# Altium PCB Phaser.PcbDoc (part 12 of 16)
Units mm, origin at the board's own origin, x right, y up, seen from the top; angles counter-clockwise.
Board outline 161.99 x 100 mm, 6 copper layers (TopLayer, MidLayer1, MidLayer2, SignalLayer1, Internal Plane 1, BottomLayer), stack 1.528 mm thick; 1017 components, 665 nets, 3453 pads, 2223 vias.
Unrouted connection lines stored in the file: 1.
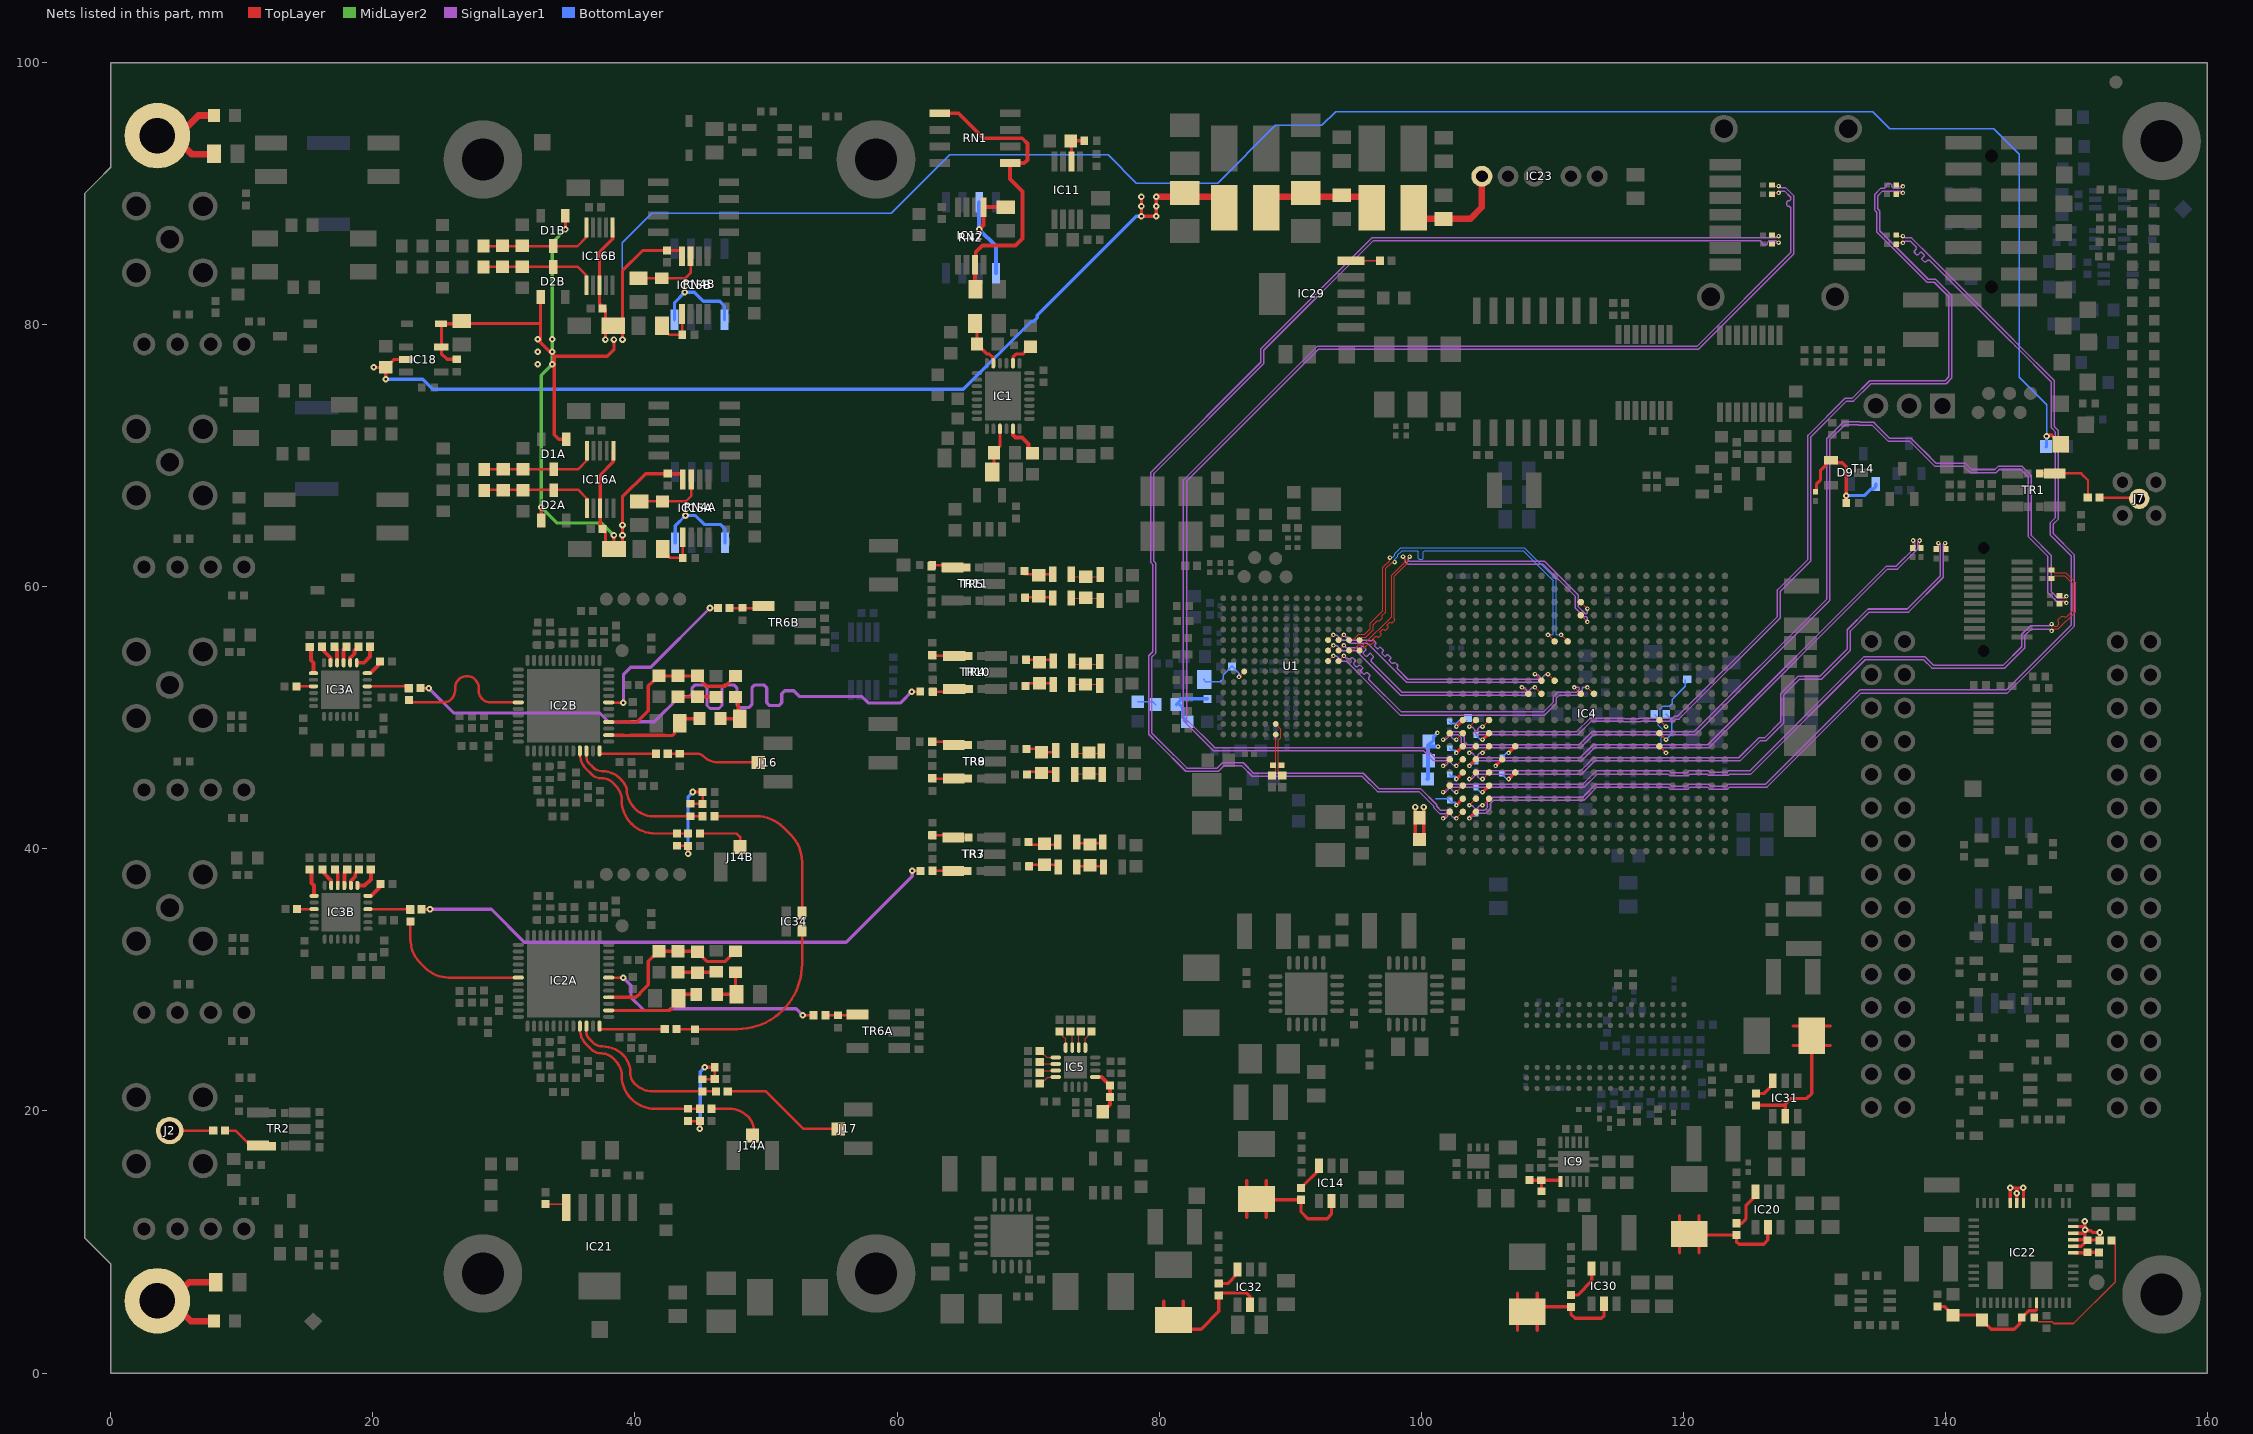
[diagram p14: the nets of this part, all layers, seen from the top]

## Via types
v1: diameter 0.5, hole 0.2, TopLayer to BottomLayer, tented both sides, 1374 vias
v2: diameter 0.35, hole 0.15, TopLayer to BottomLayer, tented both sides, 728 vias
v3: diameter 0.5, hole 0.2, TopLayer to BottomLayer, tented top, 96 vias
v4: diameter 0.6, hole 0.3, TopLayer to BottomLayer, 18 vias
v5: diameter 0.5, hole 0.2, TopLayer to BottomLayer, 5 vias
v6: diameter 0.35, hole 0.15, TopLayer to BottomLayer, 1 vias
v7: diameter 0.8, hole 0.5, TopLayer to BottomLayer, tented both sides, 1 vias

## Nets (pads, with @x,y where several pads share a name; then routed paths per layer and width w, separated by ;. In a path a pad name is that pad's centre, name@x,y a point inside that pad or via, vN(x,y) a via of type N, cw(c..) or ccw(c..) an arc to the next point about the centre after c; other vN are vias at no path point) (continued)
LVDSB11_N: IC4.J17 U1.K1 | length 27.4
  TopLayer w0.095: U1.K1@95.293,55.925 95.511,56.144 95.772,56.144 96.333,56.704 96.333,57.108 96.434,57.208 96.635,57.41 96.77,57.41 96.772,57.408 96.852,57.408 97.04,57.596 97.04,57.677 97.038,57.679 97.038,57.813 97.286,58.061 97.289,58.064 97.289,61.393 97.735,61.839 97.933,61.839 v2(97.964,61.87) ; v2(109.675,56.325) IC4.J17@110.175,55.825
  BottomLayer w0.095: v2(97.964,61.87) 97.994,61.9 97.994,62.098 98.205,62.309 98.205,62.421 98.539,62.755 99.251,62.755 99.393,62.755 99.678,62.755 99.773,62.66 99.773,62.177 99.849,62.101 100.077,62.101 100.153,62.177 100.153,62.66 100.248,62.755 100.589,62.755 107.772,62.755 110.065,60.462 110.065,56.381 110.009,56.325 v2(109.675,56.325)
LVDSB11_P: IC4.K17 U1.K2 | length 27.4
  TopLayer w0.095: U1.K2@94.489,55.925 94.557,55.993 94.846,55.993 95.216,56.364 95.681,56.364 96.113,56.796 96.113,57.199 97.069,58.155 97.069,61.484 97.58,61.995 97.58,62.193 v2(97.61,62.223) ; v2(110.675,56.325) IC4.K17@111.175,55.825
  BottomLayer w0.095: v2(97.61,62.223) 97.641,62.254 97.839,62.254 97.985,62.4 97.985,62.512 98.448,62.975 100.589,62.975 107.863,62.975 110.285,60.553 110.285,57.521 110.285,56.381 110.341,56.325 v2(110.675,56.325)
LVDSB12_N: IC4.H14 U1.K3 | length 19.5
  TopLayer w0.095: U1.K3@93.693,55.925 v2(94.093,56.325) ; v2(108.675,53.325) IC4.H14@109.175,52.825
  SignalLayer1 w0.115: v2@94.095,56.325 94.278,56.142 94.446,56.142 94.646,55.943 ; 94.667,55.922 95.995,55.922 96.035,55.881 96.198,55.881 96.251,55.934 96.336,55.934 96.534,55.736 96.534,55.651 96.442,55.559 96.442,55.475 96.64,55.277 96.725,55.277 96.817,55.368 96.902,55.368 97.1,55.17 97.1,55.086 97.008,54.994 97.008,54.909 97.206,54.711 97.291,54.711 97.382,54.803 97.467,54.803 97.665,54.605 97.665,54.52 97.573,54.428 97.573,54.343 97.771,54.145 97.856,54.145 97.923,54.211 98.007,54.211 98.205,54.013 98.205,53.929 98.178,53.901 98.178,53.739 98.254,53.662 98.974,52.943 108.973,52.943 109.041,53.01 109.041,53.145 108.898,53.287 108.713,53.287 v2(108.675,53.325)
LVDSB12_P: IC4.J14 U1.K4 | length 19.5
  TopLayer w0.095: U1.K4@92.893,55.925 v2(93.293,56.325) ; v2(109.675,53.325) IC4.J14@110.175,52.825
  SignalLayer1 w0.115: v2(93.293,56.325) 93.338,56.28 93.597,56.28 93.969,55.907 94.349,55.907 94.57,55.687 95.897,55.687 98.877,52.708 109.071,52.708 109.276,52.913 109.276,53.111 109.452,53.287 109.637,53.287 v2(109.675,53.325)
LVDSB13_N: IC4.L20 U1.J1 | length 27.1
  TopLayer w0.095: U1.J1@95.293,55.125 95.297,55.125 95.515,55.344 95.669,55.344 95.77,55.444 95.971,55.646 96.105,55.646 96.139,55.612 96.22,55.612 96.408,55.8 96.408,55.881 96.347,55.941 96.347,56.022 96.535,56.21 96.616,56.21 96.677,56.149 96.757,56.149 96.946,56.337 96.946,56.418 96.885,56.479 96.885,56.559 97.073,56.748 97.153,56.748 97.214,56.687 97.295,56.687 97.483,56.875 97.483,56.955 97.422,57.016 97.422,57.097 97.61,57.285 97.691,57.285 97.722,57.254 97.802,57.254 97.991,57.442 97.991,57.523 97.95,57.563 97.95,57.697 97.95,57.925 97.95,60.788 98.982,61.819 98.982,62.128 99.108,62.254 v2(99.108,62.297) ; IC4.L20@112.175,58.825 v2(112.675,58.325)
  SignalLayer1 w0.115: v2(99.108,62.297) 99.108,62.234 99.016,62.141 99.016,62.01 99.083,61.943 109.397,61.943 111.995,59.345 111.995,58.459 112.512,57.942 112.608,57.942 112.675,58.01 v2(112.675,58.325)
LVDSB13_P: IC4.L19 U1.J2 | length 27
  TopLayer w0.095: U1.J2@94.489,55.125 94.557,55.193 94.846,55.193 95.216,55.564 95.578,55.564 97.73,57.716 97.73,60.879 98.762,61.91 98.762,62.075 98.608,62.228 v2(98.608,62.297) ; IC4.L19@112.175,57.825 v2(112.675,57.325)
  SignalLayer1 w0.115: v2(98.608,62.297) 98.608,62.257 98.781,62.084 98.781,61.913 98.986,61.708 109.3,61.708 111.76,59.247 111.76,58.362 112.415,57.707 112.608,57.707 112.675,57.64 v2(112.675,57.325)
LVDSB14_N: IC4.G13 U1.J3 | length 18.6
  TopLayer w0.095: U1.J3@93.693,55.125 v2(94.093,55.525) ; v2(107.675,52.325) IC4.G13@108.175,51.825
  SignalLayer1 w0.115: v2(94.093,55.525) 94.095,55.525 94.278,55.342 95.13,55.342 95.17,55.302 95.333,55.302 95.498,55.467 95.555,55.467 95.781,55.241 95.781,55.184 95.563,54.966 95.563,54.909 95.789,54.683 95.846,54.683 96.071,54.909 96.128,54.909 96.354,54.682 96.354,54.626 96.181,54.453 96.181,54.291 96.31,54.162 98.53,51.942 107.973,51.943 108.041,52.01 108.041,52.145 107.898,52.287 v2@107.713,52.287
LVDSB14_P: IC4.H13 U1.J4 | length 18.6
  TopLayer w0.095: U1.J4@92.893,55.125 v2(93.293,55.525) ; v2(108.675,52.325) IC4.H13@109.175,51.825
  SignalLayer1 w0.115: v2(93.293,55.525) 93.338,55.48 93.597,55.48 93.969,55.107 95.032,55.107 98.432,51.707 102.931,51.707 108.071,51.708 108.276,51.913 108.276,52.111 108.452,52.287 108.637,52.287 v2(108.675,52.325)
LVDSB15_N: IC4.L13 U1.H3 | length 23.8
  TopLayer w0.095: U1.H3@93.693,54.325 v2(94.093,54.725) ; v2(111.675,52.325) IC4.L13@112.175,51.825
  SignalLayer1 w0.115: v2(94.093,54.725) 94.095,54.725 94.278,54.542 94.384,54.542 94.424,54.502 94.587,54.502 94.675,54.59 94.76,54.59 94.958,54.392 94.958,54.307 94.831,54.18 94.831,54.095 95.029,53.897 95.114,53.897 95.241,54.025 95.326,54.025 95.524,53.827 95.524,53.742 95.397,53.614 95.397,53.53 95.595,53.332 95.679,53.332 95.797,53.449 95.882,53.449 96.08,53.251 96.08,53.166 96.001,53.088 96.001,52.925 96.076,52.851 98.484,50.443 109.333,50.443 110.057,51.167 110.057,51.581 110.419,51.943 111.838,51.943 112.057,52.162 112.057,52.258 111.99,52.325 v2(111.675,52.325)
LVDSB15_P: IC4.M13 U1.H4 | length 23.8
  TopLayer w0.095: U1.H4@92.893,54.325 v2(93.293,54.725) ; v2(112.675,52.325) IC4.M13@113.175,51.825
  SignalLayer1 w0.115: v2(93.293,54.725) 93.338,54.68 93.597,54.68 93.969,54.307 94.286,54.307 95.909,52.684 98.386,50.208 109.431,50.208 110.292,51.069 110.292,51.483 110.517,51.708 111.935,51.708 112.292,52.065 112.292,52.258 112.36,52.325 v2(112.675,52.325)
M0: IC4.U11 R89.2 | length 5.6
  TopLayer w0.125: IC4.U11@118.175,49.825 v2(118.675,49.325)
  BottomLayer w0.075: 118.425,50.875 118.225,50.675 118.225,50.084 118.232,50.077 118.232,49.768 v2(118.675,49.325)
  BottomLayer w0.125: 118.425,50.875 118.95,50.875 119.15,51.075 119.15,51.4 120.15,52.4 R89.2@120.15,52.905
M1: IC4.U10 R91.2 | length 3
  TopLayer w0.125: IC4.U10@118.175,48.825 v2(118.675,48.325)
  BottomLayer w0.125: v2(118.675,48.325) 119.125,48.775 119.125,49.83 R91.2@118.68,50.275
M2: IC4.U9 R48.2 | length 4.1
  TopLayer w0.125: IC4.U9@118.175,47.825 v2(118.675,47.325)
  BottomLayer w0.075: R48.2@117.77,50.275 118.068,49.977 118.068,49.416 118.376,49.108 118.376,48.573 118.3,48.496 118.3,47.7 v2(118.675,47.325)
MGT_RX0_N: C204.2 IC4.A8 | length 100.9
  TopLayer w0.095: v2(101.675,46.325) IC4.A8@102.175,46.825 ; C204.2@126.77,89.953 126.877,90.06 v2(127.275,90.06)
  SignalLayer1 w0.115: v2@101.713,46.363 101.898,46.363 102.041,46.505 102.041,46.64 101.973,46.707 100.958,46.707 100.175,47.49 84.147,47.49 81.858,49.779 81.858,68.147 92.05,78.34 121.036,78.34 128.199,85.503 128.199,88.862 128.199,88.92 128.084,89.035 127.958,89.035 127.898,89.095 127.898,89.375 127.958,89.435 128.084,89.435 128.199,89.55 128.199,89.721 127.728,90.192 127.46,90.192 127.327,90.06 v2(127.275,90.06)
MGT_RX0_P: C203.2 IC4.B8 | length 101
  TopLayer w0.095: v2(102.675,46.325) IC4.B8@103.175,46.825 ; C203.2@126.77,90.653 126.863,90.56 v2(127.275,90.56)
  SignalLayer1 w0.115: v2(102.675,46.325) 102.637,46.363 102.452,46.363 102.276,46.539 102.276,46.737 102.071,46.942 101.055,46.942 100.273,47.725 84.244,47.725 82.093,49.876 82.093,68.05 92.148,78.105 121.133,78.105 128.434,85.406 128.434,89.818 127.825,90.427 127.46,90.427 127.327,90.56 v2(127.275,90.56)
MGT_RX1_N: C193.2 IC4.C11 | length 75.1
  TopLayer w0.095: v2(103.675,49.325) IC4.C11@104.175,49.825 ; C193.2@136.245,89.948 136.352,90.055 v2(136.75,90.055)
  SignalLayer1 w0.115: v2(103.675,49.325) 103.713,49.287 103.898,49.287 104.074,49.111 104.074,48.913 104.279,48.707 111.952,48.707 112.964,49.719 115.408,49.719 115.419,49.708 116.746,49.708 116.773,49.735 119.274,49.735 119.437,49.899 119.673,49.899 127.412,57.638 127.412,59.658 129.738,61.984 129.738,71.442 132.457,74.162 132.993,74.162 134.32,75.488 140.055,75.488 140.484,75.917 140.484,82.218 139.237,83.464 138.682,83.464 134.993,87.154 134.993,88.672 134.828,88.836 134.828,89.819 135.196,90.187 136.565,90.187 136.698,90.055 v2(136.75,90.055)
MGT_RX1_P: C192.2 IC4.D11 | length 75.1
  TopLayer w0.095: v2(104.675,49.325) IC4.D11@105.175,49.825 ; C192.2@136.245,90.648 136.338,90.555 v2(136.75,90.555)
  SignalLayer1 w0.115: v2(104.675,49.325) 104.637,49.287 104.452,49.287 104.309,49.145 104.309,49.01 104.377,48.942 111.855,48.942 112.866,49.954 115.505,49.954 115.517,49.943 116.648,49.943 116.676,49.97 119.176,49.97 119.34,50.134 119.575,50.134 127.177,57.735 127.177,59.755 129.503,62.081 129.503,71.539 132.36,74.397 132.896,74.397 134.222,75.723 139.957,75.723 140.249,76.015 140.249,82.121 139.14,83.229 138.585,83.229 134.758,87.057 134.758,88.575 134.593,88.739 134.593,89.917 135.092,90.415 135.099,90.422 135.382,90.422 135.497,90.537 135.497,90.669 135.557,90.729 135.837,90.729 135.897,90.669 135.897,90.537 136.012,90.422 136.297,90.422 136.47,90.422 136.565,90.422 136.698,90.555 v2(136.75,90.555)
MGT_RX2_N: C186.2 IC4.A10 | length 77.5
  TopLayer w0.095: v2(101.675,48.325) IC4.A10@102.175,48.825 ; C186.2@148.689,59.335 148.714,59.335 148.921,59.128 149.056,59.128 149.196,59.268 v2(149.225,59.268)
  SignalLayer1 w0.1: 148.375,59.323 148.375,59.312 148.56,59.128 149.041,59.128 149.181,59.268 v2(149.225,59.268)
  SignalLayer1 w0.115: v2(101.675,48.325) 101.713,48.363 101.898,48.363 102.074,48.539 102.074,48.737 102.279,48.942 102.934,48.942 103.003,48.874 103.102,48.774 103.292,48.584 103.292,48.167 103.515,47.944 ; 103.515,47.942 103.795,47.942 112.046,47.942 113.046,48.942 113.833,48.942 115.634,48.943 115.654,48.942 116.419,48.942 120.839,48.943 130.927,59.03 130.927,71.292 132.233,72.598 133.467,72.598 133.522,72.543 134.521,72.543 134.745,72.319 134.828,72.236 135.746,71.318 137.389,71.318 138.293,70.414 138.376,70.331 139.294,69.412 141.52,69.412 141.988,68.944 143.779,68.944 144.014,69.179 145.859,69.179 146.292,68.746 146.564,68.474 146.564,63.9 148.058,62.407 148.058,59.64 148.197,59.501 148.375,59.323
MGT_RX2_P: C185.2 IC4.B10 | length 77
  TopLayer w0.095: v2(102.675,48.325) IC4.B10@103.175,48.825 ; C185.2@148.689,58.7 148.714,58.7 148.921,58.908 149.056,58.908 149.196,58.768 v2(149.225,58.768)
  SignalLayer1 w0.1: 148.273,59.092 148.284,59.092 148.468,58.908 149.041,58.908 149.181,58.768 v2(149.225,58.768)
  SignalLayer1 w0.115: v2@102.637,48.363 102.452,48.363 102.309,48.505 102.309,48.64 102.377,48.707 102.836,48.707 103.057,48.486 103.057,48.069 103.126,48 103.28,47.846 ; 103.28,47.845 103.418,47.707 103.515,47.707 112.143,47.707 113.143,48.707 113.931,48.707 115.537,48.708 115.557,48.707 116.517,48.707 120.936,48.708 131.162,58.933 131.162,71.195 132.33,72.363 133.369,72.363 133.425,72.308 134.424,72.308 134.51,72.221 134.579,72.153 135.649,71.082 137.292,71.082 139.197,69.177 139.322,69.177 139.494,69.177 141.423,69.177 141.891,68.709 143.877,68.709 144.112,68.944 145.762,68.944 146.126,68.58 146.126,68.548 146.329,68.345 146.329,63.803 147.823,62.309 147.823,59.543 148.031,59.334 148.197,59.168 148.273,59.092
MGT_RX3_N: C199.2 IC4.C9 | length 43.3
  TopLayer w0.095: v2(103.675,47.325) IC4.C9@104.175,47.825 ; v2(138.036,63.525) 138.036,63.051 C199.2@138.133,62.953
  SignalLayer1 w0.115: v2(103.675,47.325) 103.713,47.287 103.898,47.287 104.074,47.111 104.074,46.913 104.279,46.707 112.215,46.707 113.215,47.707 121.954,47.707 135.587,61.341 136.343,61.341 137.903,62.901 137.903,63.398 138.03,63.525 v2(138.036,63.525)
MGT_RX3_P: C198.2 IC4.D9 | length 42.5
  TopLayer w0.095: v2(104.675,47.325) IC4.D9@105.175,47.825 ; C198.2@137.498,62.953 137.536,62.991 v2(137.536,63.525)
  SignalLayer1 w0.115: v2(104.675,47.325) 104.637,47.287 104.452,47.287 104.309,47.145 104.309,47.01 104.377,46.942 112.117,46.942 113.117,47.943 121.857,47.943 135.49,61.576 136.246,61.576 137.668,62.998 137.668,63.398 137.541,63.525 v2(137.536,63.525)
MGT_TX0_N: C205.2 IC4.A4 | length 103.8
  TopLayer w0.095: v2(101.675,42.325) IC4.A4@102.175,42.825 ; C205.2@126.77,86.843 126.863,86.75 v2(127.275,86.75)
  SignalLayer1 w0.115: v2(101.675,42.325) 101.713,42.363 101.898,42.363 102.041,42.505 102.041,42.64 101.973,42.707 101.955,42.689 101.395,42.689 100.94,43.144 100.94,43.259 99.836,44.363 96.654,44.363 95.478,45.539 87.107,45.539 86.321,46.325 84.931,46.325 84.528,45.922 82.026,45.922 79.947,48 79.205,48.743 79.205,54.729 79.516,55.04 79.516,61.699 79.369,61.846 79.369,68.739 87.754,77.125 87.754,78.145 96.226,86.617 127.09,86.617 127.223,86.75 v2(127.275,86.75)
MGT_TX0_P: C206.2 IC4.B4 | length 103.8
  TopLayer w0.095: v2(102.675,42.325) IC4.B4@103.175,42.825 ; C206.2@126.77,86.143 126.877,86.25 v2(127.275,86.25)
  SignalLayer1 w0.115: v2(102.675,42.325) 102.637,42.363 102.452,42.363 102.276,42.539 102.276,42.737 102.071,42.942 101.876,42.942 101.858,42.924 101.492,42.924 101.175,43.242 101.175,43.356 99.933,44.598 96.752,44.598 95.576,45.774 87.205,45.774 86.419,46.56 84.834,46.56 84.431,46.157 82.123,46.157 80.28,48 79.44,48.84 79.44,54.631 79.751,54.942 79.751,61.796 79.604,61.943 79.604,68.642 87.989,77.027 87.989,78.048 96.323,86.382 125.444,86.382 125.616,86.382 125.901,86.382 126.016,86.267 126.016,86.155 126.076,86.095 126.356,86.095 126.416,86.155 126.416,86.267 126.531,86.382 126.849,86.382 127.09,86.382 127.223,86.25 v2(127.275,86.25)
MGT_TX1_N: C197.2 IC4.C5 | length 90.1
  TopLayer w0.095: v2(103.675,43.325) IC4.C5@104.175,43.825 ; C197.2@136.245,86.838 136.338,86.745 v2(136.75,86.745)
  SignalLayer1 w0.115: v2(103.675,43.325) 103.713,43.287 103.898,43.287 104.074,43.111 104.074,42.913 104.279,42.707 104.934,42.707 105.284,43.058 105.284,43.476 105.515,43.707 105.675,43.707 112.42,43.707 113.42,44.707 118.833,44.707 119.007,44.534 120.343,44.534 120.517,44.707 121.833,44.707 122.008,44.532 123.342,44.532 123.517,44.707 126.383,44.707 133.565,51.889 144.728,51.889 149.843,57.003 149.843,62.43 148.261,64.012 148.221,64.051 148.221,64.775 148.622,65.176 148.622,71.912 148.553,71.981 148.299,72.235 148.299,75.729 145.504,78.524 144.945,79.083 138.956,85.072 138.873,85.155 137.416,86.612 136.935,86.612 136.802,86.745 v2(136.75,86.745)
MGT_TX1_P: C202.2 IC4.D5 | length 90
  TopLayer w0.095: v2(104.675,43.325) IC4.D5@105.175,43.825 ; C202.2@136.245,86.138 136.352,86.245 v2(136.75,86.245)
  SignalLayer1 w0.115: v2@104.637,43.287 104.452,43.287 104.309,43.145 104.309,43.01 104.377,42.942 104.836,42.942 105.049,43.155 105.049,43.574 105.418,43.942 112.322,43.942 113.322,44.942 118.931,44.942 119.104,44.769 120.246,44.769 120.419,44.942 121.931,44.942 122.106,44.767 123.244,44.767 123.419,44.942 126.286,44.942 133.468,52.124 144.631,52.124 149.608,57.101 149.608,62.333 148.261,63.679 148.094,63.846 147.986,63.954 147.986,64.872 148.387,65.273 148.387,71.815 148.064,72.138 148.064,75.632 145.338,78.358 144.848,78.848 139.159,84.537 139.118,84.577 138.987,84.709 138.858,84.837 138.786,84.91 138.623,84.91 138.492,84.779 138.407,84.779 138.209,84.977 138.209,85.061 138.379,85.232 138.379,85.317 138.181,85.515 138.096,85.515 137.898,85.317 137.813,85.317 137.615,85.515 137.615,85.599 137.774,85.759 137.774,85.921 137.573,86.123 137.451,86.245 137.318,86.377 136.935,86.377 136.802,86.245 v2(136.75,86.245)
MGT_TX2_N: C187.2 IC4.A6 | length 60.3
  TopLayer w0.095: v2(101.675,44.325) IC4.A6@102.175,44.825 ; C187.2@148.104,60.631 148.129,60.631 148.337,60.838 149.093,60.838 149.708,60.223 149.708,58.172 149.696,58.161 149.242,57.707 149.074,57.707 149.028,57.752 148.86,57.752 148.607,57.5 148.607,57.331 148.653,57.286 148.653,57.118 148.533,56.998 148.362,56.998 148.291,56.998 148.151,57.138 v2(148.107,57.138)
  SignalLayer1 w0.115: v2(101.675,44.325) 101.713,44.363 101.898,44.363 102.074,44.539 102.074,44.737 102.279,44.942 112.343,44.942 113.343,45.942 118.931,45.942 119.053,45.82 120.297,45.82 120.419,45.942 121.94,45.942 122.037,45.845 123.322,45.845 123.419,45.942 125.061,45.942 133.783,54.665 138.426,54.665 139.065,54.026 144.424,54.026 145.821,55.423 145.821,56.365 146.462,57.005 147.923,57.005 148.055,57.138 v2(148.107,57.138)
MGT_TX2_P: C188.2 IC4.B6 | length 60.3
  TopLayer w0.095: v2(102.675,44.325) IC4.B6@103.175,44.825 ; C188.2@148.104,61.266 148.129,61.266 148.337,61.058 149.184,61.058 149.928,60.315 149.928,58.081 148.624,56.778 148.291,56.778 148.151,56.638 v2(148.107,56.638)
  SignalLayer1 w0.115: v2(102.675,44.325) 102.637,44.363 102.452,44.363 102.309,44.505 102.309,44.64 102.377,44.707 112.44,44.707 113.44,45.707 118.833,45.707 118.956,45.585 120.394,45.585 120.517,45.707 121.842,45.707 121.939,45.61 123.42,45.61 123.517,45.707 125.158,45.707 133.881,54.43 138.329,54.43 138.968,53.791 144.522,53.791 146.056,55.325 146.056,56.267 146.559,56.77 147.923,56.77 148.055,56.638 v2(148.107,56.638)
MGT_TX3_N: C200.2 IC4.C7 | length 48.4
  TopLayer w0.095: v2(103.675,45.325) IC4.C7@104.175,45.825 ; C200.2@139.299,62.868 139.452,63.02 v2(139.452,63.323)
  SignalLayer1 w0.115: v2@103.713,45.363 103.898,45.363 104.074,45.539 104.074,45.737 104.279,45.942 112.142,45.942 113.142,46.942 124.231,46.942 125.752,48.463 126.187,48.463 127.432,49.708 127.432,51.844 128.757,53.169 130.435,53.169 132.512,55.245 132.512,56.72 134.091,58.299 137.084,58.299 139.598,60.814 139.598,63.255 139.584,63.255 139.515,63.323 v2(139.452,63.323)
MGT_TX3_P: C201.2 IC4.D7 | length 48.4
  TopLayer w0.095: v2(104.675,45.325) IC4.D7@105.175,45.825 ; v2(139.982,63.323) 139.982,62.935 C201.2@140.049,62.868
  SignalLayer1 w0.115: v2(104.675,45.325) 104.637,45.363 104.452,45.363 104.309,45.505 104.309,45.64 104.377,45.707 112.24,45.707 113.24,46.707 124.329,46.707 125.849,48.228 126.285,48.228 127.667,49.61 127.667,51.746 128.854,52.934 130.533,52.934 132.747,55.148 132.747,56.623 134.188,58.064 137.181,58.064 139.833,60.717 139.833,63.255 139.85,63.255 139.918,63.323 v2(139.982,63.323)
MGTAVCC: C57.2 C100.2 C124.2 C125.2 C148.2 C220.2 IC4.D6 IC4.D10 IC4.E8 IC4.F7 IC4.F9 L15.2 | length 10.7
  TopLayer w0.25: v2(104.675,44.325) IC4.D6@105.175,44.825 ; v2(104.675,48.325) IC4.D10@105.175,48.825 ; v2(105.675,46.325) IC4.E8@106.175,46.825 ; v2(106.675,45.325) IC4.F7@107.175,45.825 ; v2(106.675,47.325) IC4.F9@107.175,47.825
  BottomLayer w0.125: C57.2@100.53,47.878 C57.2@100.589,47.937 ; C220.2@104.175,44.675 104.525,44.325 v2(104.675,44.325) ; C125.2@104.175,48.675 104.525,48.325 v2(104.675,48.325) ; C100.2@106.175,45.675 106.525,45.325 v2(106.675,45.325) ; C124.2@106.175,46.975 106.525,47.325 v2(106.675,47.325)
  BottomLayer w0.25: C57.2@100.589,47.937 100.939,48.287 100.939,48.545 101.234,48.84 v2(101.234,48.85)
  BottomLayer w0.3: L15.2@100.489,45.325 100.53,45.366 100.53,46.712 C57.2@100.53,47.878 ; C57.2@100.589,47.937 100.725,47.802 v2(101.282,47.802)
MGTAVTT: C97.2 C101.2 C112.2 C113.2 C114.2 C115.2 C116.2 IC4.B5 IC4.B7 IC4.B9 IC4.B11 IC4.C4 IC4.C8 L18.2 R191.1 | length 17.5
  TopLayer w0.25: v1(99.55,43.188) 99.55,41.031 L18.2@99.867,40.713 100.185,41.031 v1(100.185,43.188) ; v2(102.675,43.325) IC4.B5@103.175,43.825 ; v2(102.675,45.325) IC4.B7@103.175,45.825 ; v2(102.675,47.325) IC4.B9@103.175,47.825 ; v2(102.675,49.325) IC4.B11@103.175,49.825 ; v2(103.675,42.325) IC4.C4@104.175,42.825 ; v2(103.675,46.325) IC4.C8@104.175,46.825
  BottomLayer w0.125: 101.111,43.825 102.038,43.825 C115.2@102.175,43.688 ; C112.2@102.15,49.725 102.15,49.705 102.288,49.567 102.584,49.567 102.675,49.476 v2(102.675,49.325) ; C115.2@102.175,43.675 C115.2@102.175,43.688 ; C114.2@102.175,45.675 102.175,45.655 102.313,45.517 102.609,45.517 102.7,45.426 v2@102.7,45.275 ; C97.2@102.175,47.675 102.175,47.655 102.313,47.517 102.609,47.517 102.7,47.426 v2@102.7,47.275 ; v2@102.562,45.216 102.562,45.512 ; v2@102.562,47.216 102.562,47.512 ; v2@102.689,49.476 102.689,49.573 102.884,49.768 R191.1@103.471,49.768 ; v2@102.7,43.287 102.7,43.439 102.609,43.53 102.313,43.53 102.175,43.667 C115.2@102.175,43.688 ; v2@103.65,42.275 103.65,42.426 103.741,42.517 104.038,42.517 104.175,42.655 C116.2@104.175,42.675 ; v2@103.65,46.275 103.65,46.426 103.741,46.517 104.038,46.517 104.175,46.655 C113.2@104.175,46.675 ; v2@103.788,42.216 103.788,42.512 ; v2@103.788,46.216 103.788,46.512
N11V5A: C230A.2 C230B.2 C231A.2 C231B.2 C241A.2 C241B.2 C366.2 D1A.1 D1B.1 D2A.1 D2B.1 D3.2 IC15A.4 IC15B.4 IC16A.3 IC16A.6 IC16B.3 IC16B.6 IC18.5 R53.2 R220.2 TP11.1 | length 245.2
  TopLayer w0.25: R53.2@26.409,77.353 25.664,77.353 25.234,77.783 IC18.5@25.234,78.283 25.234,80.033 D3.2@25.209,80.058 26.559,80.058 C366.2@26.784,80.283 26.984,80.083 29.509,80.083 32.759,80.083 ; v1@32.65,78.775 32.8,78.625 ; D2B.1@32.8,82.105 32.8,78.625 ; D2A.1@32.85,65.055 v1(32.85,66.075) ; v1(34.7,87.26) D1B.1@34.7,88.28 ; D1A.1@34.75,71.255 34.175,71.255 33.85,71.58 33.85,77.575 ; C230B.2@37.375,81.48 C230B.2@37.7,81.155 ; C230A.2@37.425,64.455 37.75,64.13 37.75,62.88 C231A.2@38.4,62.88 v1(38.4,63.925) ; C230B.2@37.475,81.43 37.3,81.605 IC16B.3@37.3,83.005 37.3,85.55 38.3,86.55 IC16B.6@38.3,87.405 ; C230A.2@37.525,64.405 37.35,64.58 IC16A.3@37.35,65.98 37.35,68.525 38.35,69.525 IC16A.6@38.35,70.38 ; v1(37.75,78.86) C230B.2@37.75,81.205 ; v1(38.4,78.86) 38.4,78.075 37.9,77.575 33.85,77.575 ; C231A.2@39.05,62.839 v1(39.05,63.925) v1(39.05,64.705) 39.05,66.865 40.815,68.63 C241A.2@42.5,68.63 43.65,68.63 IC15A.4@43.65,68.18 ; v1(39.05,78.86) 39.05,84.108 40.597,85.655 C241B.2@42.45,85.655 43.6,85.655 IC15B.4@43.6,85.205 ; v1(147.713,71.495) 147.761,71.543 147.968,71.543 148.046,71.621 TP11.1@148.795,70.873 ; 32.8,78.625 33.85,77.575
  MidLayer2 w0.25: v1(34.7,87.26) 33.7,86.26 v1(33.7,78.875) v1(33.7,77.925) v1(33.7,76.975) 32.85,76.125 v1(32.85,66.075) 34.07,64.855 37.47,64.855 v1(38.4,63.925)
  BottomLayer w0.1: v1(39.05,78.86) 39.05,86.25 41.28,88.48 59.568,88.48 64.038,92.95 76.123,92.95 78.268,90.805 84.462,90.805 88.856,95.199 92.42,95.199 93.482,96.261 134.434,96.261 135.75,94.945 143.675,94.945 145.62,93 145.62,75.982 147.713,73.889 v1(147.713,71.495)
  BottomLayer w0.25: R220.2@147.676,70.688 147.713,70.726 v1(147.713,71.495)
  other v1: 32.575,76.975 32.575,77.925 32.575,78.875
N12V0A: C252.2 C365.2 IC18.2 L9.2 | length 75.3
  TopLayer w0.25: v1(20.084,76.733) C252.2@20.984,76.733 ; v1(20.984,75.833) C252.2@20.984,76.733 ; IC18.2@22.534,77.333 21.584,77.333 C252.2@20.984,76.733 ; v1(78.65,89.767) v1(78.65,89.017) v1(78.65,88.267) v1(79.775,88.267) v1(79.775,89.017) v1(79.775,89.767)
  TopLayer w0.5: v1(79.775,89.767) C365.2@81.2,89.767 ; C365.2@82.7,89.767 84.125,89.767 L9.2@84.975,88.917
  BottomLayer w0.25: v1(20.984,75.833) 23.827,75.833 24.585,75.075 65.067,75.075 70.222,80.23 70.397,80.23 70.705,80.538 70.705,80.713 78.259,88.267 v1(78.65,88.267)
N12V0F: C248.2 C251.2 L3.2 L9.1 | length 8.1
  TopLayer w0.5: L9.1@88.175,88.917 89.025,89.767 C251.2@90.45,89.767 ; C251.2@91.2,90.042 91.475,89.767 C248.2@93.9,89.767 ; C248.2@93.95,89.767 95.375,89.767 L3.2@96.225,88.917
N12V0S: C247.2 IC23.5 L3.1 | length 8.3
  TopLayer w0.5: L3.1@99.425,88.917 100.275,88.067 C247.2@101.7,88.067 103.742,88.067 104.625,88.95 IC23.5@104.625,91.317
NetB1_1: B1.1 C243.1 R159.2 | length 7.5
  TopLayer w0.5: B1.1@4.555,94.412 5.299,95.156 5.89,95.156 6.69,95.956 R159.2@7.89,95.956 ; B1.1@4.954,94.028 5.158,94.028 6.201,92.984 C243.1@8.019,92.984
NetB2_1: B2.1 C244.1 R161.2 | length 7.5
  TopLayer w0.5: B2.1@4.555,5.512 6.099,3.968 R161.2@7.89,3.968 ; B2.1@4.954,5.896 5.998,6.94 C244.1@8.019,6.94
NetC1_2: C1.2 C80.1 IC1.27 | length 3.7
  TopLayer w0.25: C80.1@65.95,80.075 66.1,79.925 C1.2@66.1,78.525 66.1,78.5 66.45,78.15 66.475,78.15 66.875,77.75 67.055,77.75 67.325,77.48 67.325,77.075 IC1.27@67.35,77.05
NetC2_1: C2.1 C8.2 IC1.11 | length 3.5
  TopLayer w0.25: C2.1@67.275,68.75 67.4,68.875 C8.2@67.4,70.225 67.4,70.25 67.85,70.7 IC1.11@67.85,72.05
NetC3_1: C3.1 IC5.11 | length 1.3
  TopLayer w0.095: C3.1@73.218,26.06 73.368,25.91 IC5.11@73.368,24.835
NetC4_1: C4.1 IC5.12 | length 1.4
  TopLayer w0.095: C4.1@72.393,26.06 72.655,25.797 72.655,25.707 72.868,25.495 IC5.12@72.868,24.835
NetC5_1: C5.1 IC5.13 | length 1.4
  TopLayer w0.095: C5.1@70.893,24.56 71.155,24.297 71.23,24.297 71.442,24.085 IC5.13@72.118,24.085
NetC6_2: C6.2 IC1.24 | length 2.1
  TopLayer w0.25: IC1.24@68.85,77.05 68.875,77.075 68.875,77.55 69.075,77.75 69.6,77.75 69.8,77.95 69.8,77.975 70.15,78.325 C6.2@70.175,78.325
NetC7_2: C7.2 IC1.13 | length 2.8
  TopLayer w0.3: IC1.13@68.85,72.05 68.85,71.576 69.026,71.4 69.525,71.4 69.699,71.226 70.032,70.893 70.032,70.468 C7.2@70.325,70.175
NetC9_1: C9.1 IC5.14 | length 1.3
  TopLayer w0.095: C9.1@70.893,23.735 71.043,23.585 IC5.14@72.118,23.585
NetC12_1: C12.1 IC5.15 | length 1.3
  TopLayer w0.095: C12.1@70.893,22.935 71.043,23.085 IC5.15@72.118,23.085
NetC13_1: C13.1 IC5.16 | length 1.4
  TopLayer w0.095: C13.1@70.893,22.085 71.15,22.342 71.267,22.342 71.51,22.585 IC5.16@72.118,22.585
NetC14A_2: C14A.2 C371A.2 IC3A.6 | length 1.5
  TopLayer w0.3: IC3A.6@19.575,53.4 19.825,53.4 20.55,54.125 C371A.2@20.55,54.3
NetC14B_2: C14B.2 C371B.2 IC3B.6 | length 1.5
  TopLayer w0.3: IC3B.6@19.625,36.404 19.875,36.404 20.6,37.129 C371B.2@20.6,37.304
NetC15A_2: C15A.2 C372A.2 IC3A.7 | length 2
  TopLayer w0.3: IC3A.7@18.775,54.2 19.325,54.2 19.796,54.671 C372A.2@19.796,55.415
NetC15B_2: C15B.2 C372B.2 IC3B.7 | length 2
  TopLayer w0.3: IC3B.7@18.825,37.204 19.375,37.204 19.846,37.675 C372B.2@19.846,38.418
NetC16A_2: C16A.2 C373A.2 IC3A.8 | length 1.5
  TopLayer w0.3: IC3A.8@18.275,54.2 18.275,54.55 18.608,54.883 18.608,55.15 18.873,55.415 C373A.2@18.896,55.415
NetC16B_2: C16B.2 C373B.2 IC3B.8 | length 1.5
  TopLayer w0.3: IC3B.8@18.325,37.204 18.325,37.554 18.658,37.887 18.658,38.154 18.923,38.418 C373B.2@18.946,38.418
NetC25_1: C25.1 C145.2 U1.G12 | length 4.5
  TopLayer w0.125: v2(86.093,53.125) U1.G12@86.493,53.525
  BottomLayer w0.125: C145.2@83.427,52.916 83.392,52.88 83.534,52.737 84.653,52.737 84.905,52.989 84.905,53.286 85.545,53.925 C25.1@85.568,53.925 86.093,53.4 v2(86.093,53.125)
NetC26_1: C26.1 IC5.9 | length 1.4
  TopLayer w0.095: IC5.9@74.368,24.835 74.368,25.524 74.58,25.736 74.58,25.797 C26.1@74.843,26.06
NetC27_1: C27.1 IC5.10 | length 1.3
  TopLayer w0.095: IC5.10@73.868,24.835 73.868,25.91 C27.1@74.018,26.06
NetC30A_2: C30A.2 C46A.2 L52A.1 R224A.2 R225A.2 | length 8.9
  TopLayer w0.19: R225A.2@44.129,19.229 C30A.2@44.979,19.229 ; R224A.2@45.166,22.425 C46A.2@46.091,22.425 L52A.1@46.091,23.335
  TopLayer w0.25: v1(44.954,18.629) C30A.2@44.954,19.229 ; v1(45.335,23.337) L52A.1@46.091,23.335
  BottomLayer w0.25: v1@44.979,18.629 44.979,22.98 v1(45.335,23.337)
NetC30B_2: C30B.2 C46B.2 L52B.1 R224B.2 R225B.2 | length 8.9
  TopLayer w0.19: R225B.2@43.204,40.229 C30B.2@44.054,40.229 ; R224B.2@44.241,43.425 C46B.2@45.166,43.425 L52B.1@45.166,44.335
  TopLayer w0.25: v1(44.054,39.629) C30B.2@44.054,40.229 ; v1(44.41,44.337) L52B.1@45.166,44.337
  BottomLayer w0.25: v1(44.054,39.629) 44.054,43.98 v1(44.41,44.337)
NetC32_1: C32.1 R232.2 | length 1.4
  BottomLayer w0.127: C32.1@78.359,51.22 79.501,51.22 R232.2@79.718,51.003
NetC36_1: C36.1 L30.2 R39.1 R269.2 | length 2.4
  TopLayer w0.19: R39.1@70.008,40.469 70.025,40.486 R39.1@70.025,40.526 ; R39.1@70.047,40.317 72.089,40.317 72.279,40.507 L30.2@72.279,40.51
NetC36_2: C36.2 L28.2 R37.1 R248.2 | length 2.3
  TopLayer w0.19: R248.2@70.091,38.673 R248.2@70.091,38.693 ; R248.2@70.102,38.655 70.233,38.787 72.108,38.787 L28.2@72.288,38.607
NetC43A_1: C43A.1 R193A.2 TR6A.6 | length 2.5
  TopLayer w0.19: C43A.1@54.537,27.299 55.487,27.299 56.915,27.299 TR6A.6@56.985,27.369
NetC43A_2: C43A.2 IC2A.43 | length 17.5
  TopLayer w0.19: IC2A.43@38,30.175 v1(39.116,30.175) ; v1(52.801,27.299) C43A.2@53.637,27.299
  SignalLayer1 w0.24: v1(39.116,30.175) 39.695,29.596 39.695,28.675 40.694,27.676 42.593,27.676 42.715,27.798 52.302,27.798 v1(52.801,27.299)
NetC43B_1: C43B.1 R193B.2 TR6B.6 | length 2.5
  TopLayer w0.19: C43B.1@47.225,58.375 49.69,58.375 TR6B.6@49.735,58.42
NetC43B_2: C43B.2 IC2B.43 | length 12.6
  TopLayer w0.19: IC2B.43@38,51.175 38.025,51.15 38.031,51.156 v1(39.116,51.156) ; v1(45.73,58.375) C43B.2@46.325,58.375
  SignalLayer1 w0.24: v1(39.116,51.156) 39.116,53.288 39.679,53.85 41.205,53.85 v1(45.73,58.375)
NetC84_2: C84.2 IC11.2 R4.2 | length 2.7
  TopLayer w0.25: IC11.2@73.32,92.45 73.32,93.95 C84.2@73.245,94.025 R4.2@74.3,94.025
NetC86_2: C86.2 IC12.3 RN1.1 RN1.5 | length 23.3
  TopLayer w0.3: RN1.5@63.25,96.13 64.69,96.13 66.6,94.22 69.555,94.22 69.95,93.825 69.95,92.562 69.708,92.32 RN1.1@68.65,92.32 ; C86.2@65.985,82.687 65.96,82.712 IC12.3@65.96,84.562 66.005,84.607 66.005,85.529 66.508,86.032 69.025,86.032 69.575,86.582 69.575,90.152 68.615,91.112 RN1.1@68.615,92.271
NetC89_2: C89.2 IC12.5 RN2.3 RN2.5 | length 9.4
  TopLayer w0.3: v1(66.27,87.26) 66.61,87.6 IC12.5@66.61,88.962 C89.2@68.285,88.962
  BottomLayer w0.3: RN2.3@66.27,89.33 v1(66.27,87.26) 67.54,85.99 RN2.5@67.54,83.93
NetC123_2: C123.2 C131.2 IC5.5 L10.1 | length 3.6
  TopLayer w0.3: IC5.5@75.118,22.585 75.593,22.585 C131.2@76.243,21.935 C123.2@76.243,21.06 76.243,20.485 L10.1@75.693,19.935
NetC133A_1: C133A.1 IC34.2 R226A.1 R257.1 | length 15.2
  TopLayer w0.19: C133A.1@43.175,26.25 44.57,26.25 R226A.1@44.575,26.245 47.819,26.245 47.821,26.245 ccw(c47.821,31.132) 51.277,27.677 ccw(c47.708,31.247) 52.756,31.247 R257.1@52.756,33.947
NetC133A_2: C133A.2 IC2A.36 | length 5.2
  TopLayer w0.19: IC2A.36@37.3,26.475 37.3,26.305 37.355,26.25 C133A.2@42.275,26.25
NetC133B_1: C133B.1 J16.1 R226B.1 | length 7.1
  TopLayer w0.19: C133B.1@42.508,47.25 43.419,47.25 R226B.1@43.422,47.253 44.791,47.253 cw(c44.791,46.647) 45.22,47.075 ccw(c46.391,48.246) 46.391,46.59 49.398,46.59 J16.1@49.403,46.585
NetC133B_2: C133B.2 IC2B.36 | length 4.5
  TopLayer w0.19: IC2B.36@37.3,47.475 37.3,47.301 37.351,47.25 C133B.2@41.608,47.25
NetC137_1: C137.1 L23.2 L32.1 | length 2.9
  TopLayer w0.095: L32.1@73.554,45.675 73.589,45.71 74.54,45.71 75.619,45.71 L23.2@75.654,45.675
  TopLayer w0.19: C137.1@74.245,45.415 74.54,45.71 74.598,45.768 C137.1@74.655,45.825 ; C137.1@74.655,45.75 C137.1@74.762,45.857
NetC137_2: C137.2 L1.2 L21.1 | length 2.6
  TopLayer w0.095: L21.1@73.554,47.512 73.554,47.277 C137.2@74.655,47.277 ; L1.2@75.586,47.476 75.586,47.297 75.606,47.277 C137.2@74.655,47.277 ; C137.2@74.655,47.277 C137.2@74.655,47.35 C137.2@74.655,47.277
NetC140_1: C140.1 L32.2 R54.1 R271.2 | length 2.2
  TopLayer w0.19: R271.2@69.995,45.89 71.934,45.89 72.124,45.7 L32.2@72.124,45.675
NetC140_2: C140.2 L21.2 R40.1 R270.2 | length 2.6
  TopLayer w0.19: R40.1@69.88,47.625 69.95,47.555 69.97,47.555 R270.2@69.9,47.625 70.785,47.625 C140.2@71.025,47.385 ; C140.2@71.025,47.366 71.978,47.366 L21.2@72.124,47.512
NetC146_2: C146.2 R63.1 R232.1 | length 4.3
  BottomLayer w0.25: R232.1@81.318,51.003 81.382,51.067 81.445,51.131 81.643,51.328 81.643,51.43 81.659,51.446 R63.1@83.687,51.446 ; R232.1@81.509,51.067 81.806,50.77 81.806,50.032 C146.2@82.156,49.682
NetC151_1: C151.1 L39.2 L40.1 | length 2.5
  TopLayer w0.095: L40.1@73.342,54.318 73.342,54.119 73.359,54.102 C151.1@74.371,54.102 ; C151.1@74.371,54.14 C151.1@74.371,54.102 ; L39.2@75.478,54.294 75.285,54.102 C151.1@74.371,54.102
NetC151_2: C151.2 L36.2 L37.1 | length 2.2
  TopLayer w0.095: L37.1@73.342,52.54 73.354,52.553 75.395,52.553 L36.2@75.478,52.47
NetC152_1: C152.1 L40.2 R67.1 R273.2 | length 2.1
  TopLayer w0.19: R273.2@69.853,54.426 71.803,54.426 L40.2@71.912,54.318
NetC152_2: C152.2 L37.2 R61.1 R272.2 | length 2.4
  TopLayer w0.19: R272.2@69.774,52.647 71.805,52.647 L37.2@71.912,52.54 ; R272.2@69.808,52.397 R61.1@69.808,52.418 ; R272.2@69.808,52.407 R272.2@69.955,52.554
NetC161_2: C161.2 IC29.5 | length 2.2
  TopLayer w0.125: IC29.5@94.627,84.879 94.629,84.877 C161.2@96.839,84.877
NetC175_2: C175.2 IC9.1 R128.2 R129.2 | length 3.3
  TopLayer w0.25: C175.2@108.253,14.737 108.273,14.717 R129.2@109.153,14.717 ; R128.2@109.178,13.857 109.178,14.692 R129.2@109.153,14.717 ; IC9.1@110.628,14.612 110.523,14.717 R129.2@109.153,14.717
NetC190_1: C190.1 J7.1 | length 3.1
  TopLayer w0.19: C190.1@151.758,66.802 154.324,66.802 154.426,66.7 J7.1@154.788,66.7
NetC190_2: C190.2 R73.1 TR1.4 | length 5
  TopLayer w0.19: R73.1@147.207,68.645 148.323,68.645 TR1.4@148.328,68.65 150.349,68.65 150.876,68.123 C190.2@150.876,67.031
NetC196_1: C196.1 J2.1 | length 3.3
  TopLayer w0.19: J2.1@4.5,18.5 C196.1@7.825,18.5
NetC196_2: C196.2 R46.1 TR2.4 | length 4.1
  TopLayer w0.19: C196.2@8.725,18.5 9.515,18.5 10.426,17.59 10.925,17.59 11.21,17.305 12.325,17.305 R46.1@12.33,17.3
NetC211_1: C211.1 IC22.36 R18.1 R19.2 R134.1 | length 9.6
  TopLayer w0.254: R18.1@139.4,5.08 139.92,5.08 C211.1@140.575,4.425 142.403,4.425 R19.2@142.778,4.05 143.493,3.334 145.231,3.334 145.667,3.77 145.667,4.062 146.356,4.751 146.842,4.751 146.95,4.859 IC22.36@146.95,5.375
NetC221A_2: C221A.2 C222A.2 D1A.3 IC16A.10 R10A.2 | length 8.9
  TopLayer w0.19: R10A.2@28.5,68.955 C222A.2@29.95,68.955 C221A.2@31.45,68.955 D1A.3@33.8,68.955 35.655,68.955 36.35,69.65 IC16A.10@36.35,70.38
NetC221B_2: C221B.2 C222B.2 D1B.3 IC16B.10 R10B.2 | length 8.9
  TopLayer w0.19: R10B.2@28.45,85.98 29.9,85.98 31.4,85.98 33.75,85.98 35.605,85.98 36.3,86.675 IC16B.10@36.3,87.405
NetC222A_1: C222A.1 C225A.2 D2A.3 IC16A.1 R74A.2 | length 8.9
  TopLayer w0.19: R74A.2@28.5,67.405 29.95,67.405 31.45,67.405 33.8,67.405 35.655,67.405 36.35,66.71 IC16A.1@36.35,65.98
NetC222B_1: C222B.1 C225B.2 D2B.3 IC16B.1 R74B.2 | length 8.9
  TopLayer w0.19: R74B.2@28.45,84.43 29.9,84.43 31.4,84.43 33.75,84.43 35.605,84.43 36.3,83.735 IC16B.1@36.3,83.005
NetC223A_2: C223A.2 IC15A.3 R72A.2 RN4A.1 RN4A.4 | length 13.4
  TopLayer w0.19: C223A.2@40.325,66.505 R72A.2@42.1,66.505 43.88,66.505 ; v1@43.88,65.455 43.88,66.505 ; IC15A.3@44.3,68.18 44.3,66.925 43.88,66.505
  BottomLayer w0.25: RN4A.4@43.07,63.355 43.07,64.645 v1(43.86,65.435) 44.59,65.435 45.275,64.75 46.525,64.75 46.88,64.395 RN4A.1@46.88,63.355
NetC223B_2: C223B.2 IC15B.3 R72B.2 RN4B.1 RN4B.4 | length 13.4
  TopLayer w0.19: C223B.2@40.275,83.53 R72B.2@42.05,83.53 43.83,83.53 ; v1@43.83,82.48 43.83,83.53 ; IC15B.3@44.25,85.205 44.25,83.95 43.83,83.53
  BottomLayer w0.25: RN4B.4@43.02,80.38 43.02,81.67 v1(43.81,82.46) 44.54,82.46 45.225,81.775 46.475,81.775 46.83,81.42 RN4B.1@46.83,80.38
NetC234A_2: C234A.2 IC15A.5 R138A.2 | length 3.5
  TopLayer w0.19: C234A.2@42.125,62.88 42.125,62.705 42.555,62.275 42.604,62.275 42.674,62.205 R138A.2@43.655,62.205 43.655,63.775 IC15A.5@43.65,63.78
NetC234B_2: C234B.2 IC15B.5 R138B.2 | length 3.5
  TopLayer w0.19: C234B.2@42.075,79.905 42.075,79.73 42.505,79.3 42.547,79.3 42.617,79.23 R138B.2@43.605,79.23 43.605,80.8 IC15B.5@43.6,80.805
NetC246A_1: C246A.1 C283A.1 R196A.2 | length 3
  TopLayer w0.125: C246A.1@44.711,30.59 C246A.1@44.769,30.532
  TopLayer w0.25: C283A.1@43.289,30.59 C246A.1@44.711,30.59 ; C246A.1@44.769,30.532 44.816,30.579 46.159,30.579 R196A.2@46.207,30.627
NetC246A_2: C246A.2 C282A.2 C283A.2 IC2A.40 R195A.2 | length 12.8
  TopLayer w0.25: IC2A.40@38,28.675 40.067,28.675 40.183,28.791 40.233,28.791 40.359,28.916 40.359,28.967 41.025,29.633 41.025,31.427 41.438,31.84 41.489,31.84 C282A.2@41.839,32.19 C283A.2@43.289,32.19 C246A.2@44.764,32.19 ; C246A.2@44.769,32.132 45.492,31.409 46.899,31.409 R195A.2@47.674,32.184
NetC246B_1: C246B.1 C283B.1 R196B.2 | length 3.3
  TopLayer w0.25: C283B.1@43.294,51.432 C283B.1@43.394,51.532 ; C283B.1@43.369,51.582 C246B.1@44.769,51.582 ; C246B.1@44.769,51.506 C246B.1@45.069,51.506 ; C246B.1@44.769,51.609 45.069,51.609 46.172,51.609 R196B.2@46.199,51.582
NetC246B_2: C246B.2 C282B.2 C283B.2 IC2B.40 R195B.2 | length 12.9
  TopLayer w0.25: IC2B.40@38,49.675 39.153,49.675 39.178,49.7 39.613,49.7 39.638,49.675 40.148,49.675 41.025,50.553 41.025,52.427 41.438,52.84 41.489,52.84 C282B.2@41.839,53.19 C283B.2@43.289,53.19 C246B.2@44.764,53.19 ; C246B.2@44.769,53.132 45.492,52.409 46.899,52.409 R195B.2@47.674,53.184
NetC254_1: C254.1 IC31.2 L42.1 | length 15.6
  TopLayer w0.25: C254.1@125.55,20.425 127.65,20.425 127.775,20.3 ; IC31.2@127.775,19.6 127.775,20.3 ; 128.392,24.988 L42.1@129.804,24.988 ; 128.392,26.488 129.804,26.488 131.217,26.488 ; L42.1@129.8,25 129.8,21.325 129.425,20.95 128.23,20.95 127.775,20.495 127.775,20.3 ; L42.1@129.804,25.738 L42.1@129.804,24.988 ; 131.217,24.988 L42.1@129.804,24.988
NetC254_2: C254.2 IC31.6 | length 1.9
  TopLayer w0.25: C254.2@125.55,21.325 126.15,21.325 126.825,22 IC31.6@126.825,22.3
NetC261_1: C261.1 IC14.2 L43.1 | length 13.7
  TopLayer w0.25: 86.675,11.862 86.675,13.275 86.675,14.687 ; L43.1@87.425,13.275 87.475,13.225 C261.1@90.825,13.225 90.825,12.3 91.35,11.775 92.825,11.775 93.15,12.1 IC14.2@93.15,13.125 ; 88.175,11.862 88.175,13.275 88.175,14.687
NetC261_2: C261.2 IC14.6 | length 2.3
  TopLayer w0.25: C261.2@90.825,14.125 92.2,15.5 IC14.6@92.2,15.825
NetC267_2: C267.2 IC21.5 | length 1.7
  TopLayer w0.125: C267.2@33.169,12.891 34.508,12.891 IC21.5@34.76,12.639
NetC270A_1: C270A.1 C369A.2 IC3A.4 | length 3.2
  TopLayer w0.19: IC3A.4@19.575,52.4 22.6,52.4 C270A.1@22.74,52.26
NetC270A_2: C270A.2 R252.1 | length 49.5
  TopLayer w0.19: C270A.2@23.64,52.26 v1@24.272,52.26 ; v1@61.14,51.994 R252.1@61.772,51.994
  SignalLayer1 w0.24: v1(24.277,52.255) 26.169,50.362 37.313,50.362 38,49.675 39.16,49.675 39.18,49.695 41.488,49.695 43.403,51.609 44.014,51.609 44.134,51.609 44.362,51.837 44.362,52.281 44.59,52.509 45.274,52.509 45.502,52.281 45.502,50.937 45.73,50.709 46.414,50.709 46.642,50.937 46.642,52.281 46.87,52.509 47.554,52.509 47.782,52.281 47.782,51.006 48.01,50.778 48.694,50.778 48.922,51.006 48.922,52.281 49.15,52.509 49.834,52.509 50.062,52.281 50.062,51.153 50.29,50.925 50.974,50.925 51.202,51.153 51.202,51.837 51.43,52.065 52.114,52.065 52.342,51.837 52.57,51.609 53.084,51.609 57.322,51.609 57.792,51.14 60.276,51.14 v1(61.135,51.999)
NetC270B_1: C270B.1 C369B.2 IC3B.4 | length 3.3
  TopLayer w0.19: IC3B.4@19.625,35.404 22.793,35.404 cw(c22.793,35.357) C270B.1@22.826,35.39 22.853,35.39 22.866,35.404 C369B.2@22.826,35.404
NetC270B_2: C270B.2 R249.1 | length 41.6
  TopLayer w0.19: C270B.2@23.726,35.39 v1@24.358,35.39 ; v1@61.162,38.317 R249.1@61.794,38.317
  SignalLayer1 w0.24: v1(24.363,35.385) 29.055,35.385 31.567,32.872 39.04,32.872 41.707,32.872 56.115,32.872 61.157,37.914 v1(61.157,38.322)
NetC272A_2: C272A.2 C370A.1 IC3A.15 | length 1.3
  TopLayer w0.19: C370A.1@14.175,52.4 IC3A.15@15.475,52.4
NetC272B_2: C272B.2 C370B.1 IC3B.15 | length 1.3
  TopLayer w0.19: C370B.1@14.225,35.404 IC3B.15@15.525,35.404
NetC273A_2: C273A.2 C374A.2 IC3A.9 | length 1.3
  TopLayer w0.3: IC3A.9@17.775,54.2 17.775,55.193 C374A.2@17.996,55.415
NetC273B_2: C273B.2 C374B.2 IC3B.9 | length 1.3
  TopLayer w0.3: IC3B.9@17.825,37.204 17.825,38.197 C374B.2@18.046,38.418
NetC274A_2: C274A.2 C375A.2 IC3A.10 | length 1.3
  TopLayer w0.3: C375A.2@17.071,55.415 17.275,55.211 IC3A.10@17.275,54.2
NetC274B_2: C274B.2 C375B.2 IC3B.10 | length 1.3
  TopLayer w0.3: C375B.2@17.121,38.418 17.325,38.215 IC3B.10@17.325,37.204
NetC275A_2: C275A.2 C376A.2 IC3A.11 | length 1.5
  TopLayer w0.3: C376A.2@16.121,55.415 16.121,55.227 16.129,55.227 16.775,54.581 IC3A.11@16.775,54.2
NetC275B_2: C275B.2 C376B.2 IC3B.11 | length 1.5
  TopLayer w0.3: C376B.2@16.171,38.418 16.171,38.231 16.179,38.231 16.825,37.584 IC3B.11@16.825,37.204
NetC276A_2: C276A.2 C377A.2 IC3A.13 | length 2.1
  TopLayer w0.3: C377A.2@15.275,55.45 15.275,54.4 15.475,54.2 IC3A.13@15.475,53.4
NetC276B_2: C276B.2 C377B.2 IC3B.13 | length 2.1
  TopLayer w0.3: C377B.2@15.325,38.454 15.325,37.404 15.525,37.204 IC3B.13@15.525,36.404
NetC284A_2: C284A.2 R194A.1 R195A.1 | length 3.2
  TopLayer w0.25: R194A.1@46.274,28.898 C284A.2@47.749,28.898 47.674,28.973 R195A.1@47.674,30.584
NetC284B_2: C284B.2 R194B.1 R195B.1 | length 3.2
  TopLayer w0.25: R194B.1@46.519,49.932 47.874,49.932 C284B.2@47.994,49.932 47.874,50.052 R195B.1@47.874,51.582
NetC285A_2: C285A.2 IC2A.38 R194A.2 | length 7.3
  TopLayer w0.25: IC2A.38@38,27.675 38.007,27.668 42.657,27.668 43.025,28.037 43.025,28.294 C285A.2@43.327,28.596 43.63,28.898 R194A.2@44.674,28.898
NetC285B_2: C285B.2 IC2B.38 R194B.2 | length 7.7
  TopLayer w0.25: IC2B.38@38,48.675 38.01,48.665 38.32,48.665 38.328,48.658 39.17,48.658 39.178,48.65 39.613,48.65 39.621,48.658 42.251,48.658 42.255,48.654 42.872,48.654 43.023,48.804 43.023,48.872 43.025,48.875 43.025,49.193 43.749,49.917 44.904,49.917 R194B.2@44.919,49.932
NetC330_1: C330.1 R134.2 | length 11
  TopLayer w0.125: R134.2@146.77,4.225 147.095,3.9 148.15,3.9 148.275,3.775 149.775,3.775 152.95,6.95 152.95,9.85 C330.1@152.675,10.125
NetC330_2: C330.2 IC22.8 IC22.9 IC22.10 IC22.48 IC22.49 IC22.50 IC22.51 R136.2 | length 12.1
  TopLayer w0.25: IC22.10@144.95,12.975 v1(144.95,14.125) 145.45,14.125 ; IC22.9@145.45,12.975 145.45,14.125 ; IC22.8@145.95,12.975 v1(145.95,14.125) 145.45,14.125 ; IC22.50@149.75,10.675 150.65,10.675 R136.2@150.65,10.35 ; IC22.51@149.75,11.175 150.625,11.175 150.626,11.176 v1(150.626,11.573)
  TopLayer w0.254: IC22.48@149.75,9.675 150.38,9.675 R136.2@150.85,10.145 ; IC22.49@149.75,10.175 150.82,10.175 R136.2@150.85,10.145 ; v1@150.65,10.845 151.105,10.845 151.225,10.725 v1(151.775,10.725) C330.2@151.775,10.125 151.755,10.145 R136.2@150.85,10.145
  other v1: 150.65,10.925 145.45,13.725
NetC331_2: C331.2 IC22.47 R136.1 | length 2
  TopLayer w0.254: IC22.47@149.75,9.175 150.82,9.175 R136.1@150.85,9.205 151.72,9.205 C331.2@151.725,9.2
NetC333_1: C333.1 IC20.2 L50.1 | length 13.4
  TopLayer w0.25: 119.7,9.187 119.7,10.6 119.7,12.012 ; L50.1@120.45,10.6 120.525,10.525 C333.1@124.05,10.525 124.05,10.025 124.25,9.825 126.125,9.825 126.45,10.15 IC20.2@126.45,11.125 ; 121.2,9.187 121.2,10.6 121.2,12.012
NetC333_2: C333.2 IC20.6 | length 3.2
  TopLayer w0.25: C333.2@124.05,11.425 124.45,11.425 124.775,11.75 124.775,12.755 125.5,13.48 IC20.6@125.5,13.825
NetC341_1: C341.1 IC30.2 L47.1 | length 13.3
  TopLayer w0.25: 107.35,3.262 107.35,4.675 107.35,6.087 ; L47.1@108.1,4.675 108.475,5.05 C341.1@111.425,5.05 111.425,4.5 111.75,4.175 113.75,4.175 113.95,4.375 IC30.2@113.95,5.275 ; 108.85,3.262 108.85,4.675 108.85,6.087
NetC341_2: C341.2 IC30.6 | length 3
  TopLayer w0.25: C341.2@111.425,5.95 111.925,5.95 113,7.025 IC30.6@113,7.975
NetC345_1: C345.1 IC32.2 L48.1 | length 11.3
  TopLayer w0.25: L48.1@80.35,4.056 80.35,5.468 ; L48.1@81.1,4.056 81.85,4.056 81.85,5.468 ; L48.1@81.85,3.35 83.2,3.35 84.55,4.7 C345.1@84.55,5.925 84.725,6.1 86.7,6.1 86.925,5.875 IC32.2@86.925,5.2
NetC345_2: C345.2 IC32.6 | length 2.1
  TopLayer w0.25: C345.2@84.55,6.825 85.225,6.825 85.975,7.575 IC32.6@85.975,7.9
NetC354A_1: C354A.1 J17.1 | length 9.6
  TopLayer w0.19: C354A.1@47.08,21.485 48.428,21.485 48.43,21.485 49.989,21.485 52.85,18.625 53.888,18.625 53.889,18.625 J17.1@55.522,18.625
NetC354A_2: C354A.2 IC2A.34 R224A.1 | length 12.8
  TopLayer w0.19: IC2A.34@36.3,26.475 36.3,25.983 ccw(c36.94,25.983) 36.487,25.53 36.787,25.231 ccw(c37.525,25.969) 37.525,24.925 cw(c37.525,22.706) 39.092,24.278 cw(c37.778,22.958) 39.64,22.96 ccw(c40.923,22.958) 40.015,22.052 ccw(c41.382,23.419) 41.382,21.485 41.384,21.485 R224A.1@45.166,21.485 C354A.2@46.18,21.485
NetC354B_1: C354B.1 IC34.1 R257.2 | length 12.4
  TopLayer w0.19: C354B.1@46.066,42.485 49.274,42.485 cw(c49.274,39.587) 51.324,41.636 51.901,41.059 cw(c49.852,39.01) 52.75,39.01 ; IC34.1@52.75,35.191 52.75,39.01
NetC354B_2: C354B.2 IC2B.34 R224B.1 | length 11.7
  TopLayer w0.19: IC2B.34@36.3,47.475 36.3,46.983 ccw(c36.94,46.983) 36.488,46.53 36.787,46.231 ccw(c37.525,46.969) 37.525,45.925 cw(c37.525,44.032) 38.86,45.374 cw(c37.216,43.719) 39.354,44.652 cw(c39.18,44.577) 39.37,44.579 ccw(c41.579,44.613) 40.015,43.052 ccw(c41.382,44.419) 41.383,42.485 41.384,42.485 R224B.1@44.241,42.485 C354B.2@45.166,42.485
NetC355A_1: C355A.1 J14A.1 | length 4.2
  TopLayer w0.19: C355A.1@45.854,20.169 47.175,20.169 cw(c47.175,18.113) 48.631,19.565 cw(c47.524,18.463) J14A.1@49.086,18.463
NetC355A_2: C355A.2 IC2A.33 R225A.1 | length 12.8
  TopLayer w0.19: IC2A.33@35.8,26.475 35.8,26.239 35.8,26.238 ccw(c37.394,26.238) 36.267,25.111 36.678,24.7 ccw(c37.425,25.447) 37.425,24.39 cw(c37.425,23.081) 38.351,24.007 38.494,23.864 38.495,23.863 cw(c37.275,22.643) 39,22.642 ccw(c41.363,22.642) 39.18,21.738 ccw(c41.512,22.704) 39.728,20.918 ccw(c41.537,22.729) 41.537,20.169 R225A.1@44.054,20.169 C355A.2@44.954,20.169
NetC355B_1: C355B.1 J14B.1 | length 3.8
  TopLayer w0.19: C355B.1@44.954,41.169 47.763,41.169 48.029,40.904 J14B.1@48.029,40.279
NetC355B_2: C355B.2 IC2B.33 R225B.1 | length 11.9
  TopLayer w0.19: IC2B.33@35.8,47.475 35.8,47.239 35.8,47.238 ccw(c37.394,47.238) 36.267,46.111 36.678,45.7 ccw(c37.425,46.447) 37.425,45.39 cw(c37.425,44.081) 38.351,45.007 38.494,44.864 38.495,44.863 cw(c37.275,43.643) 39,43.642 ccw(c41.363,43.642) 39.18,42.738 ccw(c41.512,43.704) 39.728,41.918 ccw(c41.537,43.729) 41.537,41.169 R225B.1@43.204,41.169 C355B.2@44.054,41.169
NetC360_2: C360.2 R65.1 U1.B9 | length 4.3
  TopLayer w0.095: U1.B9@88.893,49.525 89.293,49.125 89.293,48.457 89.108,48.272 89.108,46.048 89.108,45.885 C360.2@89.398,45.595
NetC363_2: C363.2 R65.2 U1.A9 | length 3.2
  TopLayer w0.095: C363.2@88.598,45.595 88.888,45.885 88.888,46.139 U1.A9@88.888,48.725
NetC368_1: C368.1 D9.1 R262.1 T14.1 | length 9.9
  TopLayer w0.25: C368.1@130.089,67.243 130.164,67.318 130.164,67.843 130.457,68.137 130.457,68.854 130.857,69.254 130.857,69.454 131.057,69.654 D9.1@131.257,69.654 131.457,69.454 132.126,69.454 132.437,69.144 v1(132.437,66.954) R262.1@132.437,66.392
  BottomLayer w0.25: v1(132.437,66.954) 133.799,66.954 134.288,67.443 134.488,67.443 134.688,67.643 T14.1@134.688,67.843
NetC369A_1: C369A.1 IC2B.18 | length 10.9
  TopLayer w0.19: C369A.1@22.764,51.35 22.939,51.175 25.197,51.175 25.371,51.175 ccw(c25.371,52.078) 26.274,52.078 26.274,52.272 cw(c27.176,52.272) 27.176,53.175 cw(c27.176,52.272) 28.079,52.272 28.079,52.078 ccw(c28.981,52.078) 28.981,51.175 IC2B.18@31.1,51.175
NetC369B_1: C369B.1 IC2A.18 | length 11.2
  TopLayer w0.19: C369B.1@22.866,34.454 22.866,33.103 ccw(c25.406,33.103) 23.61,31.306 23.998,30.919 ccw(c25.794,32.715) 25.794,30.175 IC2A.18@31.1,30.175
NetC378_1: C378.1 L12.2 L30.1 | length 2.2
  TopLayer w0.19: L30.1@73.709,40.51 73.709,40.415 C378.1@74.739,40.415 ; C378.1@74.739,40.33 C378.1@74.739,40.415 ; L12.2@75.714,40.507 75.691,40.507 75.6,40.415 C378.1@74.739,40.415
NetC378_2: C378.2 L6.2 L28.1 | length 2.2
  TopLayer w0.19: L28.1@73.718,38.607 73.718,38.667 C378.2@74.739,38.667 ; C378.2@74.739,38.73 C378.2@74.739,38.667 ; L6.2@75.755,38.625 75.713,38.667 C378.2@74.739,38.667
NetC380_1: C380.1 L55.2 L56.1 | length 2.3
  TopLayer w0.095: L56.1@73.308,59.126 L56.1@73.351,59.126 ; L56.1@73.351,59.169 73.395,59.126 C380.1@74.4,59.126 ; C380.1@74.4,59.172 C380.1@74.4,59.126 ; L55.2@75.495,58.938 75.307,59.126 C380.1@74.4,59.126
NetC380_2: C380.2 L53.2 L54.1 | length 2.4
  TopLayer w0.095: L54.1@73.308,60.95 73.308,60.809 73.342,60.775 C380.2@74.4,60.775 ; C380.2@74.4,60.772 C380.2@74.4,60.775 ; L53.2@75.495,60.942 75.328,60.775 C380.2@74.4,60.775
NetC381_1: C381.1 L56.2 R86.1 R275.2 | length 2
  TopLayer w0.19: R275.2@69.864,59.213 71.791,59.213 L56.2@71.878,59.126
NetC381_2: C381.2 L54.2 R76.1 R274.2 | length 2.2
  TopLayer w0.19: R274.2@69.714,60.962 71.866,60.962 L54.2@71.878,60.95 ; R76.1@69.724,61.185 R274.2@69.754,61.156
NetC382_1: C382.1 R3.2 R59.1 R249.2 TR3.4 TR7.4 | length 2.7
  TopLayer w0.19: R249.2@62.734,38.317 TR3.4@64.281,38.317 R59.1@65.401,38.317
NetC383_1: C383.1 R2.1 R17.2 R250.2 TR3.6 TR7.6 | length 2.8
  TopLayer w0.19: C383.1@62.696,41.034 64.47,41.034 64.648,40.857 R2.1@65.452,40.857
NetC384_1: C384.1 R32.1 R227.2 R246.2 TR8.6 TR9.6 | length 2.9
  TopLayer w0.19: R246.2@62.674,48.172 64.068,48.172 TR9.6@64.322,47.918 R32.1@65.442,47.918
NetC385_1: C385.1 R50.1 R228.2 R251.2 TR8.4 TR9.4 | length 2.7
  TopLayer w0.19: R251.2@62.712,45.352 65.417,45.352 R50.1@65.442,45.378
NetC386_1: C386.1 R62.1 R68.2 R252.2 TR4.4 TR10.4 | length 2.8
  TopLayer w0.19: C386.1@62.737,51.969 64.236,51.969 64.452,52.185 R62.1@65.493,52.185
NetC387_1: C387.1 R66.1 R69.2 R253.2 TR4.6 TR10.6 | length 2.8
  TopLayer w0.19: R253.2@62.686,54.788 62.75,54.725 TR4.6@64.348,54.725 R66.1@65.468,54.725
NetC388_1: C388.1 R77.1 R229.2 R247.2 TR5.6 TR11.6 | length 2.7
  TopLayer w0.19: R247.2@62.684,61.646 64.066,61.646 TR5.6@64.244,61.468 R77.1@65.313,61.468